# Altium PCB PoHalf-Small.PcbDoc (part 2 of 2)
Units mil, origin at the board's own origin, x right, y up, seen from the top; angles counter-clockwise.
Board outline 2900 x 4650 mil, 2 copper layers (Top Layer, Bottom Layer), stack 33.512 mil thick; 139 components, 99 nets, 517 pads, 119 vias.
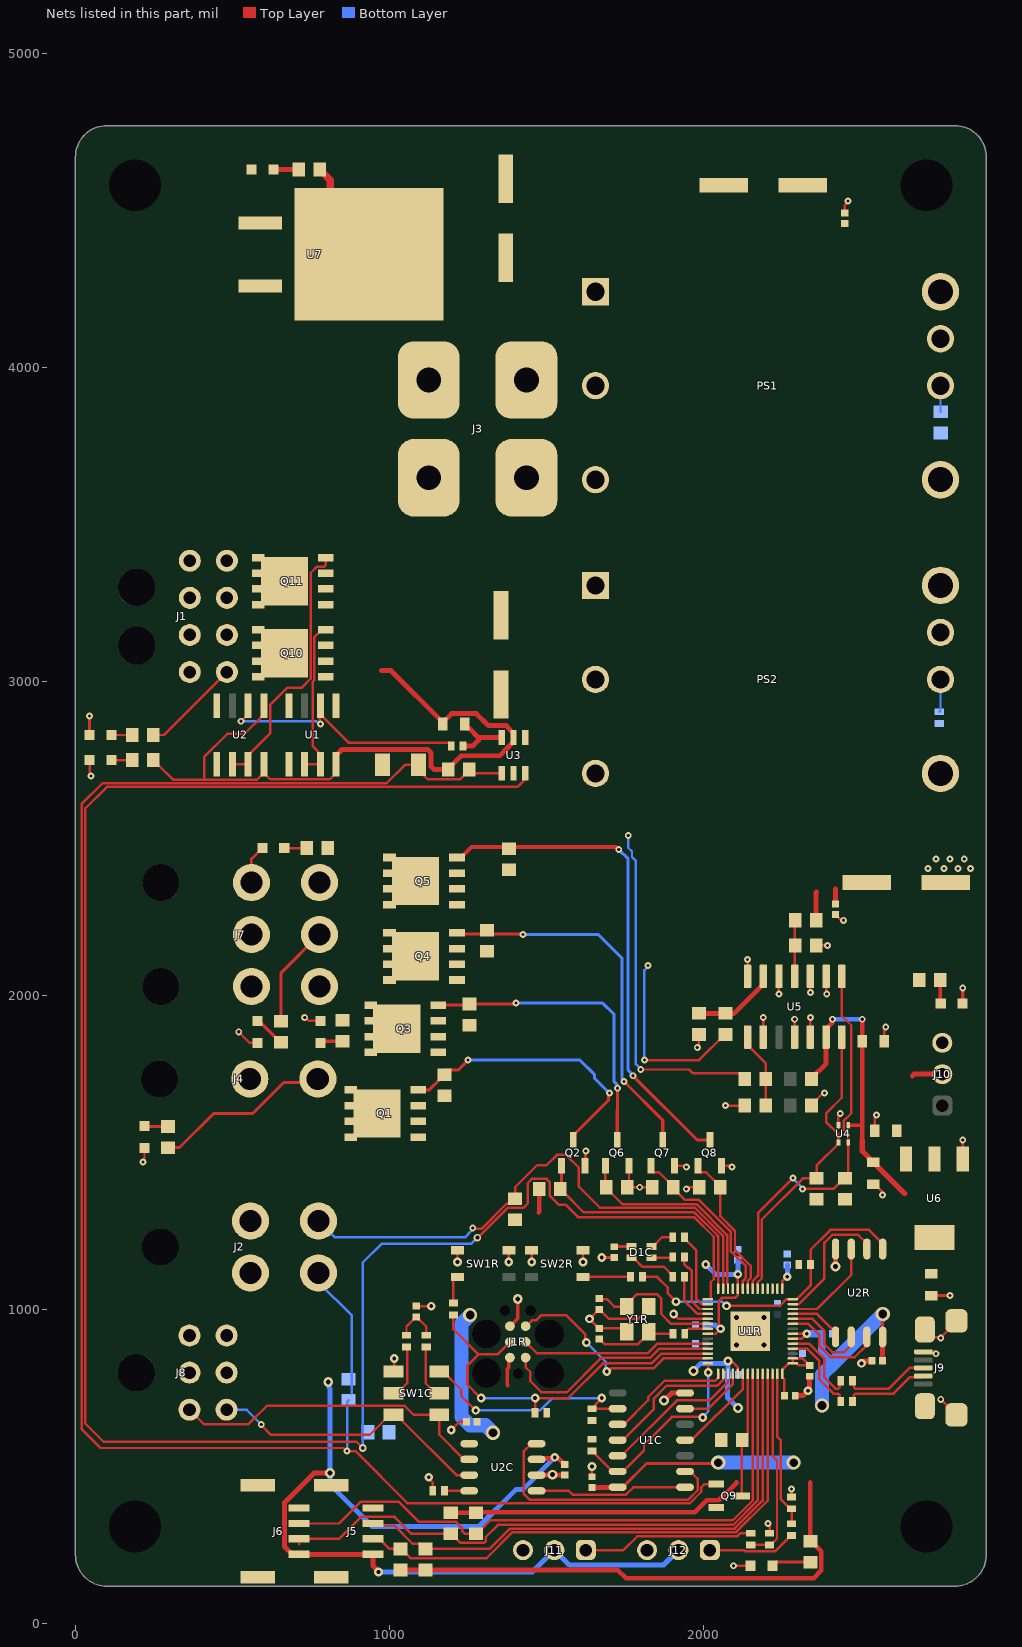
[diagram p2: the nets of this part, all layers, seen from the top]

## Via types
v1: diameter 22, hole 10, Top Layer to Bottom Layer, tented both sides, 64 vias
v2: diameter 27.56, hole 11.81, Top Layer to Bottom Layer, tented both sides, 35 vias
v3: diameter 31.5, hole 15.75, Top Layer to Bottom Layer, tented both sides, 12 vias
v4: diameter 45.28, hole 27.56, Top Layer to Bottom Layer, tented both sides, 6 vias
v5: diameter 24, hole 12, Top Layer to Bottom Layer, tented both sides, 2 vias

## Nets (pads, with @x,y where several pads share a name; then routed paths per layer and width w, separated by ;. In a path a pad name is that pad's centre, name@x,y a point inside that pad or via, vN(x,y) a via of type N, cw(c..) or ccw(c..) an arc to the next point about the centre after c; other vN are vias at no path point) (continued)
3V3_RP2CAN: C1C.1 C2.1 C3.1 C3C.1 C3R.1 C4R.1 C5.1 C5C.1 C5R.1 C6R.1 C7R.1 C8R.1 C9R.1 C10R.1 D1C.4 J1R.2 R1C.1 R3.2 R4C.1 R4R.1 R5.1 R5R.1 R18.1 R27.1 R32.1 R33.1 R34.1 R35.1 R36.1 R37.1 R38.1 U1C.14 U1R.1 U1R.10 U1R.22 U1R.33 U1R.42 U1R.43 U1R.44 U1R.48 U1R.49 U2C.5 U2R.8 U4.3 U5.6 U6.2 U6.4 | length 6864.8
  Top Layer w7.87: C1C.1@1644.65,434.17 C1C.1@1645.14,434.67 ; U1R.22@2013.25,923.74 2038.35,923.74 v2(2054.09,939.49) 2054.09,944.82 2047.55,951.36 2047.55,1027.43 2058.03,1037.91 2083.74,1037.91 2099.99,1037.91 2109.21,1047.14 U1R.10@2109.21,1066.95 v2(2109.21,1112.72) ; v2(2077.72,837.13) 2081.48,833.36 2091.94,833.36 2109.21,816.09 U1R.33@2109.21,796.28 ; U1R.1@2250.94,1066.95 2250.94,1091.98 2263.8,1104.84 v2(2266.69,1104.84) ; C10R.1@2257.44,726.89 2257.44,778.38 2252.83,782.99 2250.94,782.99 U1R.42@2250.94,796.28 2250.94,809.57 U1R.43@2270.63,829.25 ; U1R.48@2283.92,907.99 2312.95,907.99 v2(2328.7,923.74) U1R.49@2283.92,923.74 ; C4R.1@2337.56,822.76 C4R.1@2336.77,822.76 ; C4R.1@2336.77,822.76 2329.68,829.84 2329.68,830.63 2315.31,845 U1R.44@2283.92,845 U1R.43@2283.92,829.25 2297.2,829.25 2303.7,822.76 C4R.1@2336.77,822.76
  Top Layer w9.84: C5C.1@1715.51,1203.41 1717.92,1201 1770.33,1201 D1C.4@1770.63,1201.3 ; U1C.14@1725.85,434.67 1742.58,434.67 1818.46,510.55 2043.74,510.55 v4(2046.61,513.43) ; U2R.8@2570.04,913.95 v4(2570.04,986.73)
  Top Layer w10: C5C.1@1715.51,1201.29 C5C.1@1715.51,1203.41
  Top Layer w11.81: 1376.93,758.39 1375.02,760.3 1375.02,811.59 1379.75,816.33 1379.75,844.08 J1R.2@1383.43,847.76
  Top Layer w12: U4.3@2460.75,1587.56 2502.56,1587.56
  Top Layer w15: R35.1@1035,171.5 R34.1@1115,171.5 1726.75,171.5 1753.25,145 2350,145 2375,170 2375,231 2342.5,263.5 R3.2@2340,263.5 2340,450 ; R33.1@1195,353.5 R32.1@1275,353.5 ; R32.1@1275,355 1971.32,355 2009.82,393.5 2048.5,393.5 2105,450 ; 1475,1310 1476.5,1311.5 R5.1@1476.5,1385 ; R27.1@2343.5,1735 2343.5,1737.5 2390,1784 U5.6@2390,1868.35 2394.31,1872.66 2394.31,1898.25 2408.66,1912.6 2408.66,1923.66 v1(2410,1925) ; 2502.56,1587.56 2505,1590 ; 2505,1540 2505,1590 ; v1(2505,1925) C3.1@2505,1855 2505,1590
  Top Layer w15.75: C1C.1@1645.14,434.67 U1C.14@1725.85,434.67 ; C3R.1@2570.04,837.13 U2R.8@2570.04,913.95
  Top Layer w17: 2505,1540 2505,1505 C2.1@2540,1470 2640,1370
  Bottom Layer w15: v1(2410,1925) v1(2505,1925)
  Bottom Layer w15.75: v3(1967.48,805.63) 1991.5,829.65 2026.95,829.65 2027.35,829.25 2069.84,829.25 v2(2077.72,837.13) ; v2(2006.85,1144.21) 2038.35,1112.72 v2(2109.21,1112.72) C6R.1@2109.21,1158.58 ; C8R.1@2008.23,951.4 2036.85,951.4 2048.77,939.49 v2(2054.09,939.49) ; v2@2077.03,829.25 2077.03,794.51 C9R.1@2076.34,793.82 2076.34,720.39 v3(2109.21,687.52) ; v2(2266.69,1104.84) C7R.1@2266.69,1142.83
  Bottom Layer w23.62: v2(2328.7,923.74) C5R.1@2375.55,923.74 2375.55,870 2414.43,831.12
  Bottom Layer w45.28: v4(1256.61,983.43) 1256.61,982.86 1229.29,955.54 1229.29,659.53 1256.22,632.6 1305.87,632.6 v4(1329.68,608.78) ; v4(2046.61,513.43) v4(2286.61,513.43) ; v4(2376.93,695.39) 2376.93,793.62 2414.43,831.12 v4(2570.04,986.73)
5V: C4.1 C4C.1 C10.1 C11.1 J5.1 J6.1 J8.5 J10.2 J11.2 J12.2 PS2.7 PS2.8 R6.1 R26.1 U2C.3 U6.3 | length 3215.1
  Top Layer w15.75: v3(810,480) 759.59,480 665.55,385.96 665.55,245.87 690.24,221.18 J6.1@711.89,221.18 J5.1@946.89,221.18 946.89,185.75 965,167.64 v2(965,165) ; U2C.3@1468.46,523.54 1471.48,526.56 1523.05,526.56 v2(1526.54,530.04) ; v2@1538.77,526.27 1557.24,507.8 C4C.1@1558.03,507.8 ; R26.1@2358.5,2240 2358.5,2328.5 2360,2330 ; C11.1@2420,2292.13 2420,2340 ; 2665,1745 2670,1750 J10.2@2760,1750
  Bottom Layer w15.75: v3(805,770) 808.01,766.99 808.01,751.99 810,750 v3(810,480) 810,445 945,310 1285,310 1402.2,427.2 1423.7,427.2 v2(1526.54,530.04) ; v2@966.05,165 1455,165 J11.2@1525,235 1572.64,187.36 1872.36,187.36 J12.2@1920,235
5V_MEAS: R26.2 R30.1 U5.11 | length 179
  Top Layer w7.87: U5.11@2290,2061.65 2290,2238.5 R26.2@2291.5,2240
12V: C7.1 C8.1 J8.6 PS1.7 PS1.8 Q1.1 Q1.2 Q1.3 Q3.1 Q3.2 Q3.3 Q4.1 Q4.2 Q4.3 Q5.1 Q5.2 Q5.3 R2.1 R12.1 R13.1 R14.1 R25.1 | length 596.9
  Top Layer w7.87: v1(1811.81,1795) 1986,1795 2067.5,1876.5 R25.1@2070,1876.5
  Bottom Layer w7.87: v1(1811.81,1795) 1811.81,2081.03 1822.5,2091.73 v1(1822.5,2095.55)
12V_MEAS: R25.2 R29.1 U5.13 | length 268.9
  Top Layer w15: R29.1@1985,1943.5 R25.2@2070,1943.5 2097.44,1943.5 2190,2036.06 U5.13@2190,2061.65
ADC0: DNP1.1 R41.2 U1R.40 | length 623
  Top Layer w7.87: R41.2@2150,251.3 DNP1.1@2210,251.3 2213.94,251.3 2233.7,271.06 2233.7,519.9 2219.45,534.15 U1R.40@2219.45,796.28
ADC1: DNP2.1 R42.2 U1R.41 | length 498.4
  Top Layer w7.87: U1R.41@2235.2,796.28 2235.2,595.08 2245.12,585.16 2245.12,397.24 2276.06,366.3 DNP2.1@2280,366.3 R42.2@2280,318.7
AUX_SWITCH: J2.4 R38.2 U1R.13 | length 1755.5
  Top Layer w7.87: v1(1265,1260) 1267.7,1257.3 1292.3,1257.3 1372.52,1337.52 1384.02,1337.52 R38.2@1400,1353.5 1400,1390 1470,1460 1499.86,1460 1532.8,1492.94 1562.2,1492.94 1602.56,1452.58 1602.56,1392.44 1670,1325 1972.29,1325 2061.97,1235.32 U1R.13@2061.97,1066.95
  Bottom Layer w7.87: J2.4@773.94,1282.68 826.42,1230.19 1240.19,1230.19 1251.16,1241.16 1251.16,1242.34 1265,1256.18 v1(1265,1260)
CANCLK_RP2CAN: U1C.6 U1R.32 | length 217.8
  Top Layer w7.87: U1C.6@1940.91,685.16 2015.2,685.16 2093.46,763.42 U1R.32@2093.46,796.28
CANH: J8.4 SW1C.4 U2C.7 | length 932.2
  Top Layer w7.87: v1@590,635 623.11,601.89 936.97,601.89 1000.94,665.87 SW1C.4@1012.76,665.87 1024.57,665.87 1040.32,650.12 1040.32,646.77 1213.54,473.54 U2C.7@1253.9,473.54 U2C.7@1270.63,473.54
  Bottom Layer w7.87: J8.4@481.41,681.89 544.79,681.89 v1(591.68,635)
CANL: J8.1 SW1C.1 U2C.6 | length 1059.5
  Top Layer w8: J8.1@363.29,681.89 410.17,635.02 550.02,635.02 609.55,694.55 1047.98,694.55 1076.66,665.87 SW1C.1@1158.43,665.87 1158.43,602.28 1237.17,523.54 U2C.6@1253.9,523.54 U2C.6@1270.63,523.54
CANRX_RP2CAN: U1C.2 U2C.4 | length 845.6
  Top Layer w7.87: U2C.4@1468.46,573.54 1451.73,573.54 1428.11,549.92 1428.11,413.76 1446.28,395.59 1951.48,395.59 1981.26,425.37 1981.26,461.54 1957.64,485.16 U1C.2@1940.91,485.16
CANTX_RP2CAN: U1C.1 U2C.1 | length 487.4
  Top Layer w7.87: U2C.1@1468.46,423.54 1570.81,423.54 1583.01,411.34 1752.66,411.34 1776.48,435.16 U1C.1@1940.91,435.16
DBG_TX_RP2040: J1R.5 U1R.27 | length 714.8
  Top Layer w7.87: J1R.5@1433.43,947.76 1434.92,947.76 1453.49,966.32 1466.52,966.32 1483.39,983.19 1561.57,983.19 1623.78,920.98 1623.78,898.96 v2(1626.93,895.81) ; v2(1691.89,803.66) 1696.5,803.66 1706.34,813.5 1840.76,813.5 1872.26,845 U1R.27@2013.25,845
  Bottom Layer w7.87: v2(1626.93,895.81) 1688.16,834.58 1688.16,807.39 v2(1691.89,803.66)
GND: C1.2 C1C.2 C1R.2 C2.2 C2C.1 C2R.2 C3.2 C3C.2 C3R.2 C4.2 C4C.2 C4R.2 C5.2 C5C.2 C5R.2 C6.2 C6R.2 C7.2 C7R.2 C8.2 C8R.2 C9.2 C9R.2 C10.2 C10R.2 C11.2 C11R.2 C12R.2 C13R.2 D1.2 D2.2 D3.2 D4.2 D5.2 D6.2 D7.2 D8.2 D9.2 DNP1.2 DNP2.2 J1.1 J1.2 J1.3 J1.4 J1R.6 J2.1 J2.2 J3.1 J3.2 J4.1 J5.4 J5.S1 J5.S2 J6.4 J6.S1 J6.S2 J7.1 J7.2 J7.3 J8.2 J9.5 J9.6 J9.7 J9.8 J9.9 J10.3 J11.3 J12.3 PS1.2 PS1.3 PS1.4 PS2.2 PS2.3 PS2.4 Q2.2 Q6.2 Q7.2 Q8.2 Q9.2 R6C.2 R15.2 R16.2 R17.2 R19.1 R28.2 R29.2 R30.2 R31.2 R39.2 R40.2 SW1C.6 SW1R.B1 SW1R.B2 SW2R.B1 SW2R.B2 U1.4 U1.5 U1C.7 U1R.19 U1R.57 U2.4 U2.5 U2C.2 U2R.4 U3.2 U3.4 U4.4 U5.2 U5.4 U5.5 U5.9 U5.10 U5.12 U5.14 U6.1 Y1R.2 Y1R.4 | length 3500.2
  Top Layer w7.87: D5.2@45,2750 45,2708.82 50,2703.82 v1(50,2700) ; v1(215,1470) 215,1473.28 220,1478.28 D1.2@220,1515 ; v1(520,1885) 555,1850 D8.2@580,1850 ; J7.3@560.4,2360 560.4,2435.4 D9.2@595,2470 ; 711.89,253.82 713.07,255 ; v1(730,1930) 733.28,1930 743.28,1920 D7.2@780,1920 ; SW1C.6@1012.76,803.66 1014.72,805.63 v2(1014.72,845) ; C2C.1@1085.59,1011.73 v2(1132.83,1011.73) ; v2(1124.96,467.05) 1124.96,462.91 1137.76,450.12 R6C.2@1137.76,423.54 ; v2(1196.45,617.27) 1222.14,642.96 1244.02,642.96 C3C.2@1244.49,643.43 ; v2(1216.5,1152.09) SW1R.B2@1216.5,1189.49 ; v2(1379.88,1152.09) 1379.88,1185.63 SW1R.B1@1380,1185.75 ; v2(1452.72,1152.09) SW2R.B2@1452.72,1189.49 ; v2(1616.1,1152.09) SW2R.B1@1616.1,1189.49 ; Q6.2@1762.5,1459 1762.5,1395.5 R15.2@1757,1390 R16.2@1836.5,1390 ; v2(1904.49,986.73) 1920.24,970.98 U1R.19@2013.25,970.98 ; Q7.2@1907.5,1459 1937.72,1459 1941.72,1455 v1(1945,1455) ; v1(1945,1385) 1948.28,1385 1953.28,1390 R17.2@1986.5,1390 ; v1(1980,1835) 1980,1838.28 1985,1843.28 R29.2@1985,1876.5 ; Q8.2@2057.5,1459 2082.72,1459 2086.72,1455 v1(2090,1455) ; v1(2070,1650) R28.2@2131.5,1650 ; v1(2095,185) D3.2@2150,185 ; U1R.57@2101.34,970.98 v3(2105.28,974.92) ; U5.14@2140,2061.65 v1(2140,2115) ; U5.2@2190,1868.35 v1(2190,1930) ; v1(2205,320) 2210,315 DNP1.2@2210,288.7 ; v1(2240,2005) U5.12@2240,2061.65 ; DNP2.2@2280,403.7 v1(2280,430) ; U5.4@2290,1868.35 v1(2290,1925) ; U5.5@2340,1868.35 v1(2340,1930) ; v1(2340,2010) U5.10@2340,2061.65 ; R31.2@2343.5,1650 2343.5,1652.5 2381,1690 v1(2385,1690) ; R30.2@2358.5,2160 v1(2395,2160) ; U5.9@2390,2061.65 2391.06,2060.59 2391.06,2006.06 v1(2392.13,2005) ; C11.2@2420,2257.87 2420.79,2257.87 2427.87,2250.79 2427.87,2250 2435.17,2242.7 2442.3,2242.7 v1(2445,2240) ; U4.4@2429.25,1587.56 2429.25,1615.97 2435,1621.72 v1(2435,1625) ; C8.2@2450,4492.13 2450,4516.85 2460,4526.85 v1(2460,4530) ; C2.2@2540,1400 2545,1400 2570,1375 v1(2570,1365) ; C4.2@2545,1570 2545,1611.72 2550,1616.72 v1(2550,1620) ; C3.2@2575,1855 2575,1891.72 2580,1896.72 v1(2580,1900) ; J9.5@2699.68,866.18 2733.82,866.18 v1(2740,860) ; J9.7@2704.61,937.05 2728.96,912.7 2752.3,912.7 v1(2755,910) 2755,911.32 2805,961.32 J9.8@2805,964.61 ; v1(2755,715) 2756.18,715 2805,666.18 J9.9@2805,665.39 ; v1(2825,1540) 2825,1480.55 U6.1@2825.55,1480
  Top Layer w8: SW1R.B1@1377.32,1188.43 SW1R.B1@1380,1185.75 ; v2(1636.77,970.98) v2@1637.36,970.98 ; C1C.2@1644.65,466.3 C1C.2@1644.65,468.43 v2(1644.65,501.3) ; Y1R.2@1754.88,930.35 1744.37,940.87 C2R.2@1668.27,940.87 1667.48,940.87 v2@1637.36,970.98 ; Y1R.4@1824.88,1010.35 1824.88,1004.45 1791.35,970.92 1699.24,970.92 1669.06,1001.1 C1R.2@1668.27,1001.1 1667.48,1001.1 v2@1637.36,970.98
  Top Layer w9.84: v2(1676.14,1166.46) C5C.2@1715.51,1166.46
  Top Layer w10: v1(45,2890) D6.2@45,2830 D6.2@46,2831 ; C1.2@977.52,2735 C1.2@982.52,2740 ; Q2.2@1622.5,1459 1623.75,1460.25 1623.75,1503.75 v1(1625,1505) ; Q7.2@1911.25,1465.25 Q7.2@1912.5,1464 ; C5.2@2725,1045 v1(2785,1045) ; D4.2@2825,1975 v1(2825,2025)
  Top Layer w11.81: J1R.6@1383.43,947.76 1408.34,972.67 v3(1408.34,1034.3)
  Top Layer w15.75: U2C.2@1468.46,473.54 1469.15,474.23 1517.97,474.23 v3(1518.66,474.92) 1519.35,474.23 1557.34,474.23 C4C.2@1558.03,473.54 ; v3(1873.52,710.61) 1898.07,735.16 U1C.7@1940.91,735.16 ; C10R.2@2291.69,726.89 2291.92,726.66 2316.66,726.66 v2(2332.64,742.64) 2332.64,745.83 2337.56,750.76 C4R.2@2337.56,788.5 ; v3(2420.04,1138.21) U2R.4@2420.04,1193.48 ; v2(2502.91,829.25) 2510.79,837.13 C3R.2@2535.79,837.13
  other v1: 1796.75,1390 2715,2405 2765,2405 2810,2405 2850,2405 2740,2435 2785,2435 2830,2435
  other v3: 2105.28,888.31 2191.89,888.31 2191.89,974.92
INT_RP2CAN: U1C.4 U1R.34 | length 297.2
  Top Layer w7.87: U1C.4@1940.91,585.16 1961.9,585.16 2124.96,748.22 U1R.34@2124.96,793.82
KILL_FEEDBACK: Q9.3 R18.2 U1R.35 | length 396.5
  Top Layer w7.87: Q9.3@2122,407.5 2122,589.42 2140.71,608.13 U1R.35@2140.71,796.28
KILL_SWITCH: J2.3 R23.2 | length 427.9
  Bottom Layer w7.87: J2.3@773.94,1117.32 773.94,1087.49 880,981.43 880,778.5 880,733.34
LEDB_RP2CAN: R8C.1 U1R.18 | length 168.1
  Top Layer w7.87: R8C.1@1938.94,1104.84 1938.94,1028.19 1980.39,986.73 U1R.18@2013.25,986.73
LEDG_RP2CAN: R7C.1 U1R.17 | length 213.3
  Top Layer w7.87: R7C.1@1938.94,1167.83 1938.94,1144.21 1948.79,1134.36 1951.72,1134.36 1961.57,1124.5 1961.57,1027.82 1986.91,1002.48 U1R.17@2013.25,1002.48
LEDR_RP2CAN: R5C.1 U1R.16 | length 255
  Top Layer w7.87: R5C.1@1938.94,1230.83 1938.94,1226.89 1977.32,1188.5 1977.32,1034.34 1993.44,1018.23 U1R.16@2013.25,1018.23
MISO_RP2CAN: U1C.12 U1R.31 | length 475
  Top Layer w7.87: U1C.12@1726.34,535.16 1738.81,535.16 1915.19,711.54 2019.31,711.54 2077.72,769.95 U1R.31@2077.72,796.28
MOSI_RP2CAN: U1C.11 U1R.30 | length 454.6
  Top Layer w7.87: U1C.11@1726.34,585.16 1743.07,585.16 1841.5,683.58 1841.5,717.56 1882.71,758.78 2044.28,758.78 2061.97,776.47 U1R.30@2061.97,796.28
MOTOR_EN: R20.1 R21.2 U3.6 | length 204.1
  Top Layer w15.75: R21.2@1233.7,2795 1265,2795 1283,2813 1283,2822 ; R20.1@1240,2865 1240,2860 1247.13,2852.87 1252.13,2852.87 1283,2822 ; U3.6@1357.6,2822 1283,2822
mOTOR_PWR: J1.5 J1.6 J1.7 J1.8 Q10.D Q11.D R8.1 | length 316.9
  Top Layer w7.87: R8.1@248.5,2830 282.05,2830 J1.5@482.41,3030.35
nCS_RP2CAN: R4C.2 U1C.13 U1R.28 | length 646.2
  Top Layer w7.87: R4C.2@1644.65,550.71 1648.58,550.71 1655.47,543.82 1655.47,539.29 1709.61,485.16 U1C.13@1726.34,485.16 1743.07,485.16 1810.26,552.35 1810.26,569.67 1899.37,658.78 1996.22,658.78 v2(1997.78,657.22) ; U1R.28@2013.25,829.25 2014.72,829.25 v2(2014.72,800.12)
  Bottom Layer w7.87: v2(1997.78,657.22) 1997.78,659.52 2014.72,676.47 v2(2014.72,800.12)
NetC1_1: C1.1 Q9.1 R22.2 R23.1 U3.1 | length 5753.3
  Top Layer w7.87: C1.1@1072.8,2703.11 C1.1@1092.48,2722.8 ; C1.1@1092.48,2717.8 1121.71,2688.56 1224.56,2688.56 1253.5,2717.5 R22.2@1253.5,2720 1265.5,2708 U3.1@1357.6,2708 ; C1.1@1092.48,2735 1049.61,2735 991.02,2676.42 86.42,2676.42 20,2610 20,620 80,560 853.32,560 863.32,550 891.33,550 1057.15,384.17 1956.21,384.17 1992.68,420.64 1992.68,434.49 2003.19,445 Q9.1@2040,445
  Bottom Layer w7.87: v1(865,550) 865,706.5 R23.1@870,711.5
NetC2C_2: C2C.2 R2C.2 R3C.2 | length 144.3
  Top Layer w7.87: R3C.2@1054.09,918.82 1054.09,946.77 1084.8,977.48 C2C.2@1085.59,977.48 1086.38,977.48 1117.09,946.77 R2C.2@1117.09,918.82
NetC2R_1: C2R.1 R1R.2 Y1R.3 | length 263.4
  Top Layer w8: C2R.1@1668.27,906.61 1669.06,906.61 1684.75,890.92 1791.35,890.92 1824.88,924.45 Y1R.3@1824.88,930.35 1831.5,923.74 R1R.2@1902.6,923.74
NetD1_1: D1.1 R1.1 | length 75.6
  Top Layer w9.84: D1.1@220,1585 221.5,1583.5 R1.1@295,1583.5
NetD1C_1: D1C.1 R5C.2 | length 80.1
  Top Layer w7.87: D1C.1@1833.62,1201.3 1838.54,1201.3 1868.07,1230.83 R5C.2@1901.54,1230.83
NetD1C_2: D1C.2 R7C.2 | length 68.7
  Top Layer w7.87: D1C.2@1833.62,1165.87 1899.57,1165.87 R7C.2@1901.54,1167.83
NetD1C_3: D1C.3 R8C.2 | length 158.5
  Top Layer w7.87: D1C.3@1770.63,1165.87 1775.55,1165.87 1804.09,1137.32 1872.99,1137.32 1901.54,1108.78 R8C.2@1901.54,1104.84
NetD2_1: D2.1 R4.2 | length 81.5
  Top Layer w16: D2.1@630,4630 R4.2@711.5,4630
NetD3_1: D3.1 R3.1 | length 124.8
  Top Layer w9.84: D3.1@2220,185 2231.5,196.5 R3.1@2340,196.5
NetD4_1: D4.1 R6.2 | length 75.6
  Top Layer w9.84: R6.2@2753.5,2050 2753.5,1976.5 D4.1@2755,1975
NetD5_1: D5.1 R7.2 | length 66.5
  Top Layer w7.87: D5.1@115,2750 R7.2@181.5,2750
NetD6_1: D6.1 R8.2 | length 66.5
  Top Layer w7.87: D6.1@115,2830 R8.2@181.5,2830
NetD7_1: D7.1 R9.1 | length 72.1
  Top Layer w10: D7.1@780,1850 785,1855 R9.1@850,1855
NetD8_1: D8.1 R10.1 | length 103.4
  Top Layer w10: D8.1@580,1920 591,1909 595,1909 652.5,1851.5 R10.1@655,1851.5
NetD9_1: D9.1 R11.1 | length 71.5
  Top Layer w7.87: D9.1@665,2470 R11.1@736.5,2470
NetPS1_6: PS1.6 R39.1 | length 103.8
  Bottom Layer w7.87: PS1.6@2754.21,3961.97 2754.21,3859.29 R39.1@2755,3858.5
NetPS2_6: PS2.6 R40.1 | length 125
  Bottom Layer w7.87: R40.1@2750,2903.7 2754.21,2907.91 PS2.6@2754.21,3026.97
NetQ1_4: Q1.4 Q2.3 R2.2 | length 923.1
  Top Layer w10: Q1.4@1099,1707 Q1.4@1092,1700 1126.5,1700 1157.5,1731 1157.5,1733.5 1172.5,1748.5 R2.2@1175,1748.5 ; R2.2@1157.5,1748.5 1160,1748.5 1175,1763.5 1218.5,1763.5 v1(1250,1795) ; Q2.3@1585,1541 1585,1555 1697.7,1667.7 1697.7,1687.7 v1(1700,1690)
  Bottom Layer w10: v1(1250,1795) 1606.54,1795 1652.12,1749.42 1652.12,1737.88 v1(1700,1690)
NetQ3_4: Q3.4 Q6.3 R12.2 | length 981.7
  Top Layer w10: Q3.4@1155,1970 1251.5,1970 R12.2@1255,1973.5 1392.86,1973.5 1393.89,1974.53 1400.96,1974.53 v1(1402.87,1976.44) ; Q6.3@1725,1541 1725.29,1541.29 1725.29,1635.53 1725.9,1636.14 1725.9,1705.08 v1(1725.62,1705.37)
  Bottom Layer w10: v1(1402.87,1976.44) 1678.56,1976.44 1715,1940 1715,1726.15 1723.32,1717.83 1723.32,1707.67 v1(1725.62,1705.37)
NetQ4_4: Q4.4 Q7.3 R13.2 | length 1191
  Top Layer w10: Q4.4@1215,2200 1218.09,2196.91 1423.09,2196.91 v1(1425,2195) ; v1(1746.61,1726.63) 1870,1603.23 Q7.3@1870,1541
  Bottom Layer w10: v1(1425,2195) 1665,2195 1740,2120 1740,1736.48 1746.61,1729.87 v1(1746.61,1726.63)
NetQ5_4: Q5.4 Q8.3 R14.2 | length 1600.5
  Top Layer w10: v1(1775,1745) 1979,1541 Q8.3@2020,1541
  Top Layer w12: Q5.4@1215,2440 1228,2440 1261.5,2473.5 1721.5,2473.5 v1(1730,2465)
  Bottom Layer w10: v1(1730,2465) 1759.54,2435.46 1759.54,1763.16 1775,1747.71 v1(1775,1745)
NetQ10_4: Q10.4 U1.6 U1.7 | length 513.6
  Top Layer w7.87: U1.6@730,2737 U1.7@780,2737 772.94,2744.06 772.94,2777.06 755,2795 755,2998.71 760.85,3004.57 760.85,3141.35 784.5,3165 Q10.4@797.5,3165
NetQ11_4: Q11.4 U2.6 U2.7 | length 851.1
  Top Layer w7.87: U2.6@500,2737 U2.7@550,2737 550,2765 619.94,2834.94 619.94,2925.58 675.36,2981 721.14,2981 749.44,3009.3 749.44,3346.58 768.8,3365.94 792.25,3365.94 797.5,3371.19 Q11.4@797.5,3395
NetR2C_1: R2C.1 SW1C.2 | length 172.3
  Top Layer w7.87: R2C.1@1117.09,881.42 1115.12,879.45 1115.12,766.26 1146.61,734.76 SW1C.2@1158.43,734.76
NetR3C_1: R3C.1 SW1C.5 | length 172.3
  Top Layer w7.87: SW1C.5@1012.76,734.76 1024.57,734.76 1056.06,766.26 1056.06,879.45 R3C.1@1054.09,881.42
NetR6C_1: R6C.1 U2C.8 | length 78.7
  Top Layer w7.87: R6C.1@1175.16,423.54 U2C.8@1253.9,423.54
NetR6R_1: R6R.1 SW1R.A2 | length 91.3
  Top Layer w7.87: R6R.1@1203.7,1021.18 1203.7,1095.98 1212.56,1104.84 SW1R.A2@1216.5,1104.84
NetR7R_1: R7R.1 SW2R.A1 | length 151.6
  Top Layer w7.87: SW2R.A1@1616.1,1104.84 R7R.1@1767.68,1104.84
NetR21_1: R21.1 U1.2 U2.2 | length 836.3
  Top Layer w7.87: v1(526.88,2873.79) 528.79,2873.79 550,2895 U2.2@550,2923 ; v1(780,2865) 778.04,2866.96 778.04,2893.04 U1.2@780,2895 ; U1.2@780,2923 U1.2@780,2895 ; R21.1@1196.3,2795 1196.3,2798.94 1189.41,2805.83 869.17,2805.83 U1.2@780,2895
  Bottom Layer w7.87: v1(526.88,2873.79) 767.38,2873.79 776.18,2865 v1(780,2865)
NetU1R_2: U1R.2
NetU1R_3: U1R.3
NetU1R_4: U1R.4
NetU1R_5: U1R.5
NetU1R_11: U1R.11
Orin_PWR: J4.2 Q1.D R1.2 | length 567.4
  Top Layer w10: R1.2@295,1516.5 331.5,1516.5 440,1625 565,1625 663.7,1723.7 760.64,1723.7 J4.2@771.94,1735
Orin_SW: Q2.1 R5.2 U1R.14 | length 804.3
  Top Layer w7.87: R5.2@1543.5,1385 1543.5,1382.5 1559.56,1366.44 1562.06,1366.44 1618.5,1310 1970,1310 1973.58,1306.42 1974.73,1306.42 2043.86,1237.29 2043.86,1236.14 2046.22,1233.78 U1R.14@2046.22,1066.95
  Top Layer w10: R5.2@1547.5,1389 Q2.1@1547.5,1459
QSPI_SCLK_RP2040: U1R.52 U2R.6 | length 286.6
  Top Layer w7.87: U1R.52@2283.92,970.98 2346.61,970.98 2384.8,932.8 2384.8,890.14 2410.25,864.69 2446.42,864.69 2470.04,888.31 U2R.6@2470.04,909.96
QSPI_SD0_RP2040: U1R.53 U2R.5 | length 178.4
  Top Layer w7.87: U1R.53@2283.92,986.73 2361.18,986.73 2420.04,927.87 U2R.5@2420.04,909.96
QSPI_SD1_RP2040: U1R.55 U2R.2 | length 427.3
  Top Layer w7.87: U1R.55@2283.92,1018.23 2303.73,1018.23 2384.8,1099.3 2384.8,1213.31 2410.25,1238.76 2479.82,1238.76 2479.88,1238.7 2492.48,1238.7 2520.04,1211.14 U2R.2@2520.04,1189.49
QSPI_SD2_RP2040: U1R.54 U2R.3 | length 309.4
  Top Layer w7.87: U1R.54@2283.92,1002.48 2361.18,1002.48 2470.04,1111.34 U2R.3@2470.04,1189.49
QSPI_SD3_RP2040: U1R.51 U2R.7 | length 339.2
  Top Layer w7.87: U1R.51@2283.92,955.24 2333.4,955.24 2368.56,920.07 2368.56,884.11 2403.73,848.94 2480.67,848.94 2520.04,888.31 U2R.7@2520.04,909.96
QSPI_SS_RP2040: R5R.2 R7R.2 U1R.56 U2R.1 | length 1007.5
  Top Layer w7.87: R7R.2@1805.08,1104.84 1852.03,1104.84 1885.24,1071.64 1885.24,1053.23 v2(1912.36,1026.1) ; v2(2073.14,1012.32) 2242.45,1012.32 2264.11,1033.98 U1R.56@2283.92,1033.98 ; U1R.56@2297.2,1033.98 2340.51,1077.28 R5R.2@2340.51,1144.21 2340.51,1191.29 2403.73,1254.51 2526.68,1254.51 2570.04,1211.14 U2R.1@2570.04,1189.49
  Bottom Layer w7.87: v2(1912.36,1026.1) 2058.69,1026.1 2072.46,1012.32 v2(2073.14,1012.32)
RUN_RP2040: J1R.4 R4R.2 R6R.2 U1R.26 | length 1275.3
  Top Layer w7.87: R6R.2@1203.7,983.78 1203.7,937.88 1283.39,858.19 ; v2(1291.64,719.02) 1290.31,719.02 1247.99,761.34 1247.99,822.79 1283.39,858.19 ; J1R.4@1383.43,897.76 1343.86,858.19 1283.39,858.19 ; R4R.2@1463.54,671.77 v2(1463.54,719.02) 1569.09,719.02 1679.32,829.25 1834.24,829.25 1865.73,860.75 U1R.26@2013.25,860.75
  Bottom Layer w7.87: v2(1291.64,719.02) v2(1463.54,719.02)
SCK_RP2CAN: U1C.10 U1R.29 | length 400.1
  Top Layer w7.87: U1C.10@1726.34,635.16 1746.58,635.16 1823.96,712.53 1823.96,722.29 1876.19,774.53 2037.76,774.53 2046.22,782.99 U1R.29@2046.22,796.28
SCL_0: R37.2 U1R.7 U4.2 U5.8 | length 1279.3
  Top Layer w7.87: U1R.7@2156.46,1066.95 2156.46,1091.48 2173.58,1108.6 2173.58,1308.58 v1(2285,1420) ; v1(2315,1385) 2414,1385 2447.5,1418.5 R37.2@2450,1418.5 ; U5.8@2440,2061.65 2440,1935.85 2470,1905.85 2470,1625.2 2445.91,1601.1 2445.91,1574.01 2460.75,1559.17 U4.2@2460.75,1532.44 2460.75,1427.25 R37.2@2451,1417.5
  Bottom Layer w7.87: v1(2285,1420) 2285,1417.5 2315,1387.5 v1(2315,1385)
SCL_0_1: J6.2 R33.2 U1R.37 | length 1991
  Top Layer w7.87: J6.2@711.89,270.39 839.76,270.39 909.72,340.35 1016.15,340.35 1070.01,286.5 R33.2@1195,286.5 1197.5,286.5 1226.44,257.56 1301.2,257.56 1306.44,262.8 1306.44,276.44 1345,315 2094.28,315 2172.2,392.92 U1R.37@2172.2,796.28
SCL_1: J5.2 R35.2 U1R.39 | length 1761.8
  Top Layer w7.87: J5.2@946.89,270.39 968.54,270.39 1000.44,238.5 R35.2@1035,238.5 1037.5,238.5 1066.44,209.56 1309.56,209.56 1392.17,292.17 2103.74,292.17 2199.37,387.79 2203.7,392.12 U1R.39@2203.7,796.28
SDA_0: R36.2 U1R.6 U4.1 U5.7 | length 970.5
  Top Layer w7.87: U1R.6@2172.2,1066.95 2172.2,1087.2 2185,1100 2185,1287.26 2316.24,1418.5 R36.2@2360,1418.5 2360,1459.25 2429.25,1528.5 U4.1@2429.25,1532.44 2429.25,1559.17 2390,1598.42 2390,1625 2440,1675 U5.7@2440,1868.35
SDA_0_1: J6.3 R32.2 U1R.36 | length 1969
  Top Layer w7.87: J6.3@711.89,319.61 839.76,319.61 909.72,389.57 1028.4,389.57 1093.4,324.56 1212.08,324.56 1230.95,305.69 1230.95,296.24 1240.69,286.5 R32.2@1275,286.5 1277.5,286.5 1321,330 2093.14,330 2156.46,393.32 U1R.36@2156.46,796.28
SDA_1: J5.3 R34.2 U1R.38 | length 1742.2
  Top Layer w7.87: J5.3@946.89,319.61 954.76,311.73 1016.91,311.73 1074.08,254.56 1098.94,254.56 R34.2@1115,238.5 1318.5,238.5 1383.58,303.58 2099.01,303.58 2187.95,392.52 U1R.38@2187.95,796.28
Sens_0: J11.1 R41.1 | length 547.2
  Top Layer w7.87: J11.1@1625,235 1745,235 1788.7,278.7 2106.43,278.7 2116.43,288.7 R41.1@2150,288.7
Sens_1: J12.1 R42.1 | length 283.3
  Top Layer w7.87: J12.1@2020,235 2128.07,235 2131.53,231.54 2228.47,231.54 2269.17,272.24 2269.17,274.41 2276.06,281.3 R42.1@2280,281.3
SOFTWARE_KILL: R19.2 U1R.15 U3.3 | length 6499.5
  Top Layer w7.87: v5(915,560) 895,580 90,580 31.42,638.58 31.42,2596.42 100,2665 1407.9,2665 1426.34,2683.44 1426.34,2688.44 1427.4,2689.5 1432.4,2689.5 U3.3@1432.4,2703 ; v5(1280,1230) 1281.15,1230 1375.71,1324.56 1426.2,1324.56 1440,1338.36 1440,1403.64 1452.8,1416.44 1500.2,1416.44 1510,1406.64 1510,1363.36 1538.36,1335 1560,1335 1600,1295 1970,1295 2032.44,1232.56 2032.44,1097.35 2022.6,1087.5 2022.6,1033.98 U1R.15@2013.25,1033.98
  Bottom Layer w7.87: v5(915,560) 915,1150 975,1210 1260,1210 v5(1280,1230)
Solinoid_1_PWR: J7.6 Q5.D R11.2
Solinoid_1_SW: Q8.1 R17.1 U1R.8 | length 476.1
  Top Layer w7.87: Q8.1@1982.5,1459 1982.5,1445 1989.56,1437.94 2008.06,1437.94 2053.5,1392.5 R17.1@2053.5,1390 2053.5,1297.65 2100,1251.15 2100,1189.75 2150,1139.75 2150,1101.17 2140.71,1091.88 U1R.8@2140.71,1066.95
Solinoid_2_PWR: J7.5 Q4.D R10.2 | length 326.7
  Top Layer w10: R10.2@655,1918.5 655,2072.71 J7.5@776.94,2194.65
Solinoid_2_SW: Q7.1 R16.1 U1R.9 | length 558
  Top Layer w7.87: Q7.1@1832.5,1459 1832.5,1445 1839.56,1437.94 1858.06,1437.94 1903.5,1392.5 R16.1@1903.5,1390 1903.5,1387.5 1941,1350 1985,1350 2086.26,1248.74 2086.26,1187.35 2134.8,1138.8 2134.8,1102.12 2124.96,1092.27 U1R.9@2124.96,1066.95
Solinoid_3_PWR: J7.4 Q3.D R9.2
Solinoid_3_SW: Q6.1 R15.1 U1R.12 | length 691.9
  Top Layer w7.87: Q6.1@1687.5,1459 1687.5,1392.5 R15.1@1690,1390 1690,1387.5 1741.08,1336.42 1977.02,1336.42 2074.84,1238.6 2074.84,1083.11 2077.72,1080.24 U1R.12@2077.72,1066.95
SWCLK_RP2040: J1R.3 U1R.24 | length 606.9
  Top Layer w7.87: J1R.3@1433.43,897.76 1468.86,862.32 1822.76,862.32 1852.69,892.24 U1R.24@2013.25,892.24
SWDIO_RP2040: J1R.1 U1R.25 | length 718.6
  Top Layer w7.87: J1R.1@1433.43,847.76 1433.43,817.21 1447.99,802.65 1447.99,772.72 1483.39,737.32 1564.64,737.32 1673.89,846.57 1829.29,846.57 1859.21,876.5 U1R.25@2013.25,876.5
TERM_DET_RP2CAN: R1C.2 SW1C.3 U1C.9 | length 723.9
  Top Layer w7.87: SW1C.3@1158.43,803.66 1170.24,803.66 1228.5,745.4 1228.5,725.72 v2(1274.57,679.65) ; R1C.2@1644.65,685.16 R1C.2@1648.58,685.16 ; v2(1676.14,719.02) 1655.47,698.35 1655.47,692.05 R1C.2@1648.58,685.16 ; U1C.9@1726.34,685.16 R1C.2@1648.58,685.16
  Bottom Layer w7.87: v2(1274.57,679.65) 1479.29,679.65 1518.66,719.02 v2(1676.14,719.02)
USB_N: J9.2 R3R.1 | length 268.8
  Top Layer w7.87: R3R.1@2474.37,708.12 2478.09,711.85 2478.09,728.64 2482.7,733.25 2605,733.25 2657.22,785.47 2695.75,785.47 J9.2@2699.68,789.41
USB_P: J9.3 R2R.1 | length 272.9
  Top Layer w7.87: R2R.1@2474.37,774.13 2478.09,770.41 2478.09,753.62 2482.7,749 2590,749 2656,815 J9.3@2699.68,815
USB_RP2040_N: R3R.2 U1R.46 | length 267.4
  Top Layer w7.87: U1R.46@2283.92,876.5 2329.32,876.5 2367.64,838.17 2367.64,778.89 2413.28,733.25 2428.63,733.25 2433.25,728.64 2433.25,711.85 R3R.2@2436.97,708.12
USB_RP2040_P: R2R.2 U1R.47 | length 267.4
  Top Layer w7.87: U1R.47@2283.92,892.24 2335.84,892.24 2383.39,844.69 2383.39,785.42 2419.81,749 2428.63,749 2433.25,753.62 2433.25,770.41 R2R.2@2436.97,774.13
V+: J3.3 J3.4 Q10.1 Q10.2 Q10.3 Q11.1 Q11.2 Q11.3 R7.1 R20.2 R22.1 U1.1 U1.8 U2.1 U2.8 U3.5 U7.1 U7.3 | length 2270.6
  Top Layer w7.87: R7.1@248.5,2750 248.5,2747.5 264.56,2731.44 267.06,2731.44 310.67,2687.83 410,2687.83 ; U2.8@600,2723 U2.8@600,2709 ; U2.1@600,2923 600,2895 538.82,2833.82 484.18,2833.82 410,2759.64 410,2687.83 ; U1.8@830,2737 830,2709 810.06,2689.06 619.94,2689.06 U2.8@600,2709 ; 410,2687.83 578.83,2687.83 U2.8@600,2709
  Top Layer w15.75: U1.8@830,2737 830,2765 848.7,2783.7 1121.43,2783.7 1132.16,2772.98 1132.16,2730.72 1142.88,2720 R22.1@1186.5,2720 1186.5,2722.5 1227.9,2763.9 1351.2,2763.9 1380.47,2793.17 1380.47,2793.97 1395,2808.5 U3.5@1395,2822 1395,2835.5 1381.74,2848.76 1381.74,2849.57 1371.31,2860 1314.42,2860 1276.55,2897.87 1197.87,2897.87 R20.2@1170,2870 ; 975,3035 1005,3035 R20.2@1170,2870 ; R20.2@1170,2865 R20.2@1170,2870
Vreg: C6.1 C9.1 J8.3 PS1.1 PS2.1 R4.1 R24.1 U7.2 | length 1392.3
  Top Layer w7.87: v1(1800,1765) 1953.64,1765 1965.08,1753.56 2115.44,1753.56 2131.5,1737.5 R24.1@2131.5,1735
  Top Layer w23.62: R4.1@778.5,4630 778.5,4627.5 786.69,4619.31 789.19,4619.31 812,4596.5 U7.2@812,4360
  Bottom Layer w7.87: v1(1760,2510) 1760,2471.09 1772.04,2459.05 1772.04,2442.02 1784.67,2429.39 1784.67,1781.93 1800,1766.6 v1(1800,1765)
Vreg_MEAS: R24.2 R28.1 U5.1 | length 242.6
  Top Layer w7.87: U5.1@2140,1868.35 2140,1842.76 2198.5,1784.26 R24.2@2198.5,1735 R28.1@2198.5,1650
XIN_RP2040: C1R.1 U1R.20 Y1R.1 | length 443.1
  Top Layer w7.87: C1R.1@1668.27,1035.35 1669.55,1034.07 1691.89,1034.07 1715.61,1010.35 Y1R.1@1754.88,1010.35 1754.88,1016.26 1788.35,1049.72 1851.43,1049.72 1865.12,1036.03 1865.12,986.73 1896.61,955.24 U1R.20@2013.25,955.24
XOUT_RP2040: R1R.1 U1R.21 | length 82.1
  Top Layer w7.87: R1R.1@1940,923.74 1940,927.68 1951.81,939.49 U1R.21@2013.25,939.49
pads on no net: J1.9 J1.10 J1R.A J1R.B J1R.C J1R.D J1R.E J1R.F J1R.G J2. J4. J7. J8.7 J9.1 J9.4 J10.1 SW1R.A1 SW2R.A2 U1.3 U1C.3 U1C.5 U1C.8 U2.3

## Polygon pours and split planes (outlines as drawn)
GND on Bottom Layer "NONET_L-01_P-001" (solid, remove dead copper, pour order 1): 2700,5000 cw(c2700,4800) 2900,4800 2900,200 cw(c2700,200) 2700,0 300,0 cw(c300,300) 0,300 0,4800 cw(c200,4800) 200,5000
Vreg on Top Layer "NONET_L-01_P-001" (solid, remove dead copper, pour order 21): 1045,4150 1045,4570 1055,4580 1210,4580 1350,4440 1580,4440 1580,4150
Vreg on Top Layer "NONET_L-01_P-001" (solid, remove dead copper, pour order 20): 1735,3125 1345,3125 1300,3170 1300,3320 1420,3440 1735,3440
3V3_RP2CAN on Top Layer "3V3_RP2040" (solid, remove dead copper, pour order 5): 2628.9,415.63 1200.15,415.63 1200.15,1335.63 2628.9,1335.63
V+ on Top Layer "NONET_L-01_P-001" (solid, remove dead copper, pour order 19): 770,3300 770,2880 910,2880 1280,3250 1280,4125 660,4125 660,4480 635,4505 360,4505 360,3800 770,3390
Solinoid_3_PWR on Top Layer "NONET_L-01_P-001" (solid, remove dead copper, pour order 18): 1105,1815 1105,1970 1050,2025 915,2025 840,2100 735,2100 700,2065 700,1995 745,1950 800,1950 815,1935 815,1915 840,1890 865,1890 915,1840 915,1805 930,1790 1070,1790 1075,1785
Solinoid_1_PWR on Top Layer "NONET_L-01_P-001" (solid, remove dead copper, pour order 12): 857.75,2463.1 1016.9,2463.1 1040,2440 1040,2290 1025,2275 710,2275 710,2390 815,2495 825.85,2495
5V on Top Layer "NONET_L-01_P-001" (solid, remove dead copper, pour order 17): 2615.03,1630 2590,1604.97 2590,1525 2615.03,1500 2615.03,1425 2675,1425 2705,1455 2705,2294.76 2649.88,2349.88 2610,2310 2535,2310 2615.03,2229.97
GND on Top Layer "NONET_L-01_P-001" (solid, remove dead copper, pour order 16): 2715,2310 2840,2310 2865,2335 2865,2435 2835,2465 2720,2465 2680,2425 2680,2345
3V3_RP2CAN on Top Layer "NONET_L-01_P-001" (solid, remove dead copper, pour order 15): 2590,1335 2715,1460 2715,1530 2720,1535 2745,1535 2755,1525 2755,1460 2855,1360 2855,1180 2617.5,942.5
5V on Top Layer "NONET_L-01_P-001" (solid, remove dead copper, pour order 3): 2295,2310 1010,1025 1010,910 850,750 435,750 435,845 695,845 850,1000 850,1080 2410,2640 2410,3280 2540,3410 2780,3410 2840,3350 2840,3150 2800,3110 2680,3110 2649.88,3079.88 2649.88,2349.88 2610,2310
12V on Top Layer "NONET_L-01_P-001" (solid, remove dead copper, pour order 9): 505,875 530,900 530,1015 490,1055 490,1260 530,1300 1050,1300 2340,2590 2340,3940 2440,4040 2800,4040 2840,4080 2840,4340 2780,4400 2570,4400 2500,4470 2440,4470 2400,4510 2400,4640 2380,4660 2220,4660 2200,4640 2200,4460 2140,4400 2060,4320 2060,2750 1740,2430 1165,2430 1165,2270 1320,2270 1380,2210 1380,2190 1360,2170 1165,2170 1165,1940 1125,1940 1125,1725 1085,1725 950,1590 490,1590 355,1455 355,1030 425,960 425,905 454.88,875
Orin_PWR on Top Layer "NONET_L-01_P-001" (solid, remove dead copper, pour order 0): 680.13,1699.87 680.13,1745.13 745,1810 890,1810 1040.13,1659.87 1040.13,1556.97 1013.15,1530 850,1530
Solinoid_2_PWR on Top Layer "NONET_L-01_P-001" (solid, remove dead copper, pour order 13): 910,2035 1145,2034.99 1145,2140 1020,2265 680,2265 680,2175 745,2110 835,2110
Vreg on Top Layer "NONET_L-01_P-001" (solid, remove dead copper, pour order 10): 255,875 385,875 427.5,917.5 185,1160 185,1890 185,2380 305,2500 40,2500 40,1090
Vreg on Top Layer "NONET_L-01_P-001" (solid, remove dead copper, pour order 8): 160,2660 40,2540 40,2500 1770,2500 2020,2750 2020,4440 1580,4440 1580,4150 1720,4010 1720,3500 1660,3440 1600,3440 1600,3240 1720,3120 1720,2710 1670,2660 990,2660
mOTOR_PWR on Top Layer "NONET_L-01_P-001" (solid, remove dead copper, pour order 6): 455,2985 417,3023 417,3430 740,3430 740,3010 715,2985

## Keep-outs
Bottom Layer:
  lines w10: 353.03,465 480,465 560,545 570,545 780,545 ; 475,2925 475,2930 475,2915 500,2890 ; 805,800 840,800 ; 810,2875 838.13,2875 1020,3056.87 ; 815,1111.87 815,1145
  lines w17: 6.87,2930 475,2930 ; 1020,3056.87 1030,3056.87 1080,3106.87 1080,3715
Keep-Out Layer:
  region: 2901.68,337.49 cw(c2681.69,337.49) 2681.68,117.49 2556.68,117.49 2556.68,462.49 2901.68,462.49
  region: 2680,4770 cw(c2680,4550) 2900,4550 2900,4425 2555,4425 2555,4770
  region: 0,4550 cw(c220,4550) 220,4770 345,4770 345,4425 0,4425
  region: 220,120 cw(c220,340) 0,340 0,465 345,465 345,120
  lines w10: 0,452.08 0,4750 cw(c250,4750) 250,5000 2649.88,5000 ; 2648.66,5000 cw(c2648.66,4750) 2898.66,4750 ; 2900,250 2900,4748.03

## Other copper
Top Layer:
  pour cut-out: 2076.61,934.2 2026.61,984.2 2026.61,1029.2 2116.61,1029.2 2116.61,994.2
  pour cut-out: 2166.83,1041.29 2166.61,1041.07 2166.61,824.32 2219.23,824.32 2246.55,851.64 2246.55,924.25 2261.61,939.32 2261.61,1039.32
  pour cut-out: 1736.61,418.43 1946.61,418.43 1951.61,423.43 1951.61,673.43 1811.61,673.43 1721.61,613.43
  pour cut-out: 1868.8,1054.11 1868.77,1054.15 1868.77,1074.54 1668.19,1073.42 1656.68,1061.91 1656.68,1057.26 1692.24,1057.26 1716.3,1033.2 1738.47,1033.2 1753.49,1048.22 1763.49,1048.22
  pour cut-out: 1366.04,795.58 1370.09,806.32 1370.09,839.21 1364.04,845.26 1334.04,845.26 1334.04,820.26 1344.04,810.26

## Silkscreen, mask and mechanical layers (free items; w line width, h text height)
Top Overlay:
  lines w10: 550,725 605,725 745,725 ; 605,825 550,825 750,825 ; 650,625 650,910 650,925 ; 870,1165 1070,1165 ; 930,2905 1130,2905 ; 930,3005 1130,3005 1030,3005 ; 930,3105 1030,3105 1130,3105 ; 970,1065 970,1265 ; 1030,2805 1030,3205 ; 855,2045 955,2045 ; 855,2045 855,2435 ; 855,2045 955,2045 ; 855,2045 855,2175 955,2175 955,2045 ; 855,2435 955,2435 ; 855,2435 955,2435 ; 855,2435 855,2305 955,2305 955,2435 ; 955,2045 955,2435 ; 550,625 750,625 750,925 550,925 550,625 ; 870,1065 1070,1065 1070,1265 870,1265 870,1065 ; 930,2805 1130,2805 1130,3205 930,3205 930,2805
  text "Motor" at 1072.5,3187.49 h15 r270
  text "GND" at 972.5,3174.99 h15 r270
  text "Motor" at 1067.5,3087.49 h15 r270
  text "GND" at 972.5,3074.99 h15 r270
  text "Motor" at 1067.5,2987.49 h15 r270
  text "GND" at 972.5,2974.99 h15 r270
  text "Motor" at 1062.5,2887.49 h15 r270
  text "GND" at 972.5,2869.99 h15 r270
  text "Sol_1" at 896.67,2406.65 h20 r270
  text "Sol_2" at 896.67,2284.99 h20 r270
  text "Sol_3" at 896.67,2154.99 h20 r270
  text "BOOT" at 1607.72,1267.94 h40 r180
  text "RESET" at 1349.98,1257.94 h30 r180
  text "GND" at 912.5,1234.99 h15 r270
  text "AUX" at 1012.5,1234.99 h15 r270
  text "Kill" at 1012.5,1137.49 h15 r270
  text "GND" at 912.5,1134.99 h15 r270
  text "Vreg" at 595,902.49 h15 r270
  text "12V" at 692.5,893.74 h15 r270
  text "GND" at 592.5,794.99 h15 r270
  text "5V" at 692.5,787.5 h15 r270
  text "CANL" at 592.5,702.49 h15 r270
  text "CANH" at 692.5,702.49 h15 r270
  text "TERM / ON" at 1163.9,623.43 h40 r180
Bottom Overlay:
  drawing of 31 lines, arcs and shapes, not listed
  text "PoHalf" at 2840,2255 h60 r90
  text "The Underwater Robotics Team" at 2700,2240 h60 r90
  text "Sens" at 1315,246.65 h20 r90
  text "GND" at 1170,236.66 h20 r90
  text "5V" at 1245,226.66 h20 r90

## Text inside footprints (layer, text, board x,y; h text height)
U1: Top Overlay "*" at 847,2945.5 h50 r270; Mechanical 13 "*" at 798.5,2904.5 h50 r270
U2: Top Overlay "*" at 617,2945.5 h50 r270; Mechanical 13 "*" at 568.5,2904.5 h50 r270
U3: Top Overlay "*" at 1342.6,2685.5 h50 r90; Mechanical 13 "*" at 1387,2734 h50 r90
U7: Top Overlay "*" at 563,4597.5 h50 r270; Mechanical 13 "*" at 697,4472.5 h50 r270